# Altium PCB Phaser.PcbDoc (part 2 of 16)
Units mm, origin at the board's own origin, x right, y up, seen from the top; angles counter-clockwise.
Board outline 161.99 x 100 mm, 6 copper layers (TopLayer, MidLayer1, MidLayer2, SignalLayer1, Internal Plane 1, BottomLayer), stack 1.528 mm thick; 1017 components, 665 nets, 3453 pads, 2223 vias.
Unrouted connection lines stored in the file: 1.
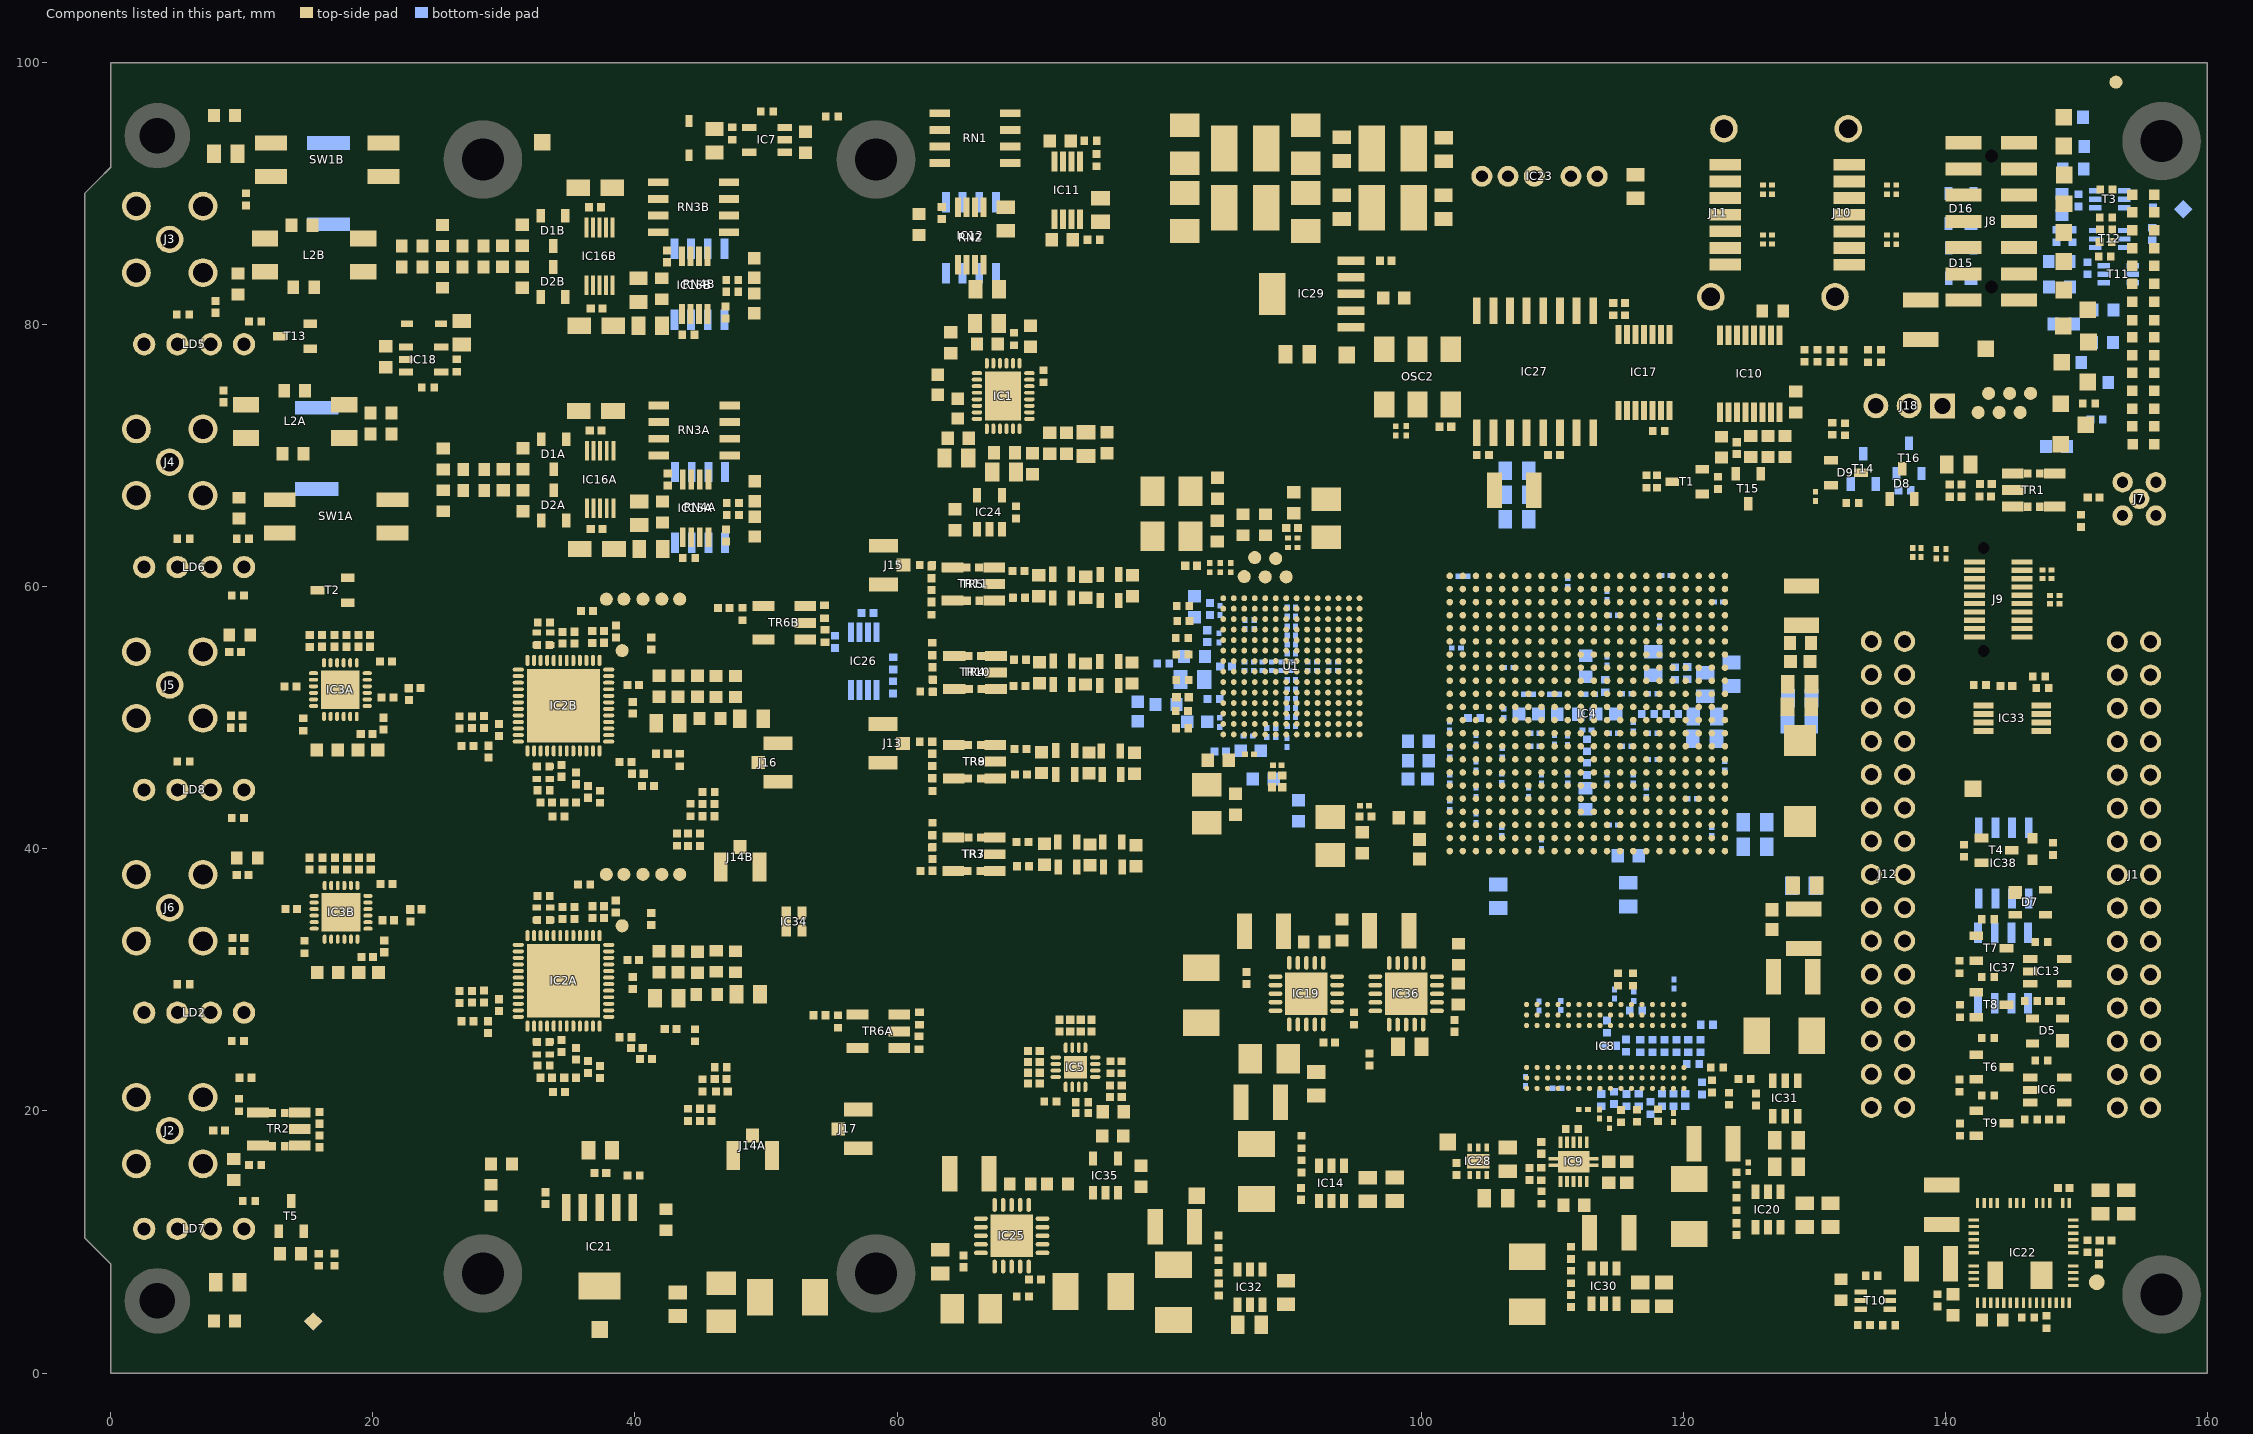
[diagram p6: the components of this part, seen from the top]

## Components (designator, comment, footprint, x,y, rotation, side; value= is the part's Value field where it differs from the comment) (continued)
C236 "100nF" CAPC0603X33N 98.056,71.895 r270 top
C237 "100nF" CAPC0603X33N 98.856,71.9 r270 top
C238 "10nF" CAPC1005X55N 101.835,72.207 r0 top
C239A "100nF" CAPC1005X55N 46.95,63.905 r270 top (schematic designator C239)
C239B "100nF" CAPC1005X55N 46.9,80.93 r270 top (schematic designator C239)
C240 "22uF" CAPC1709X100N 115.79,39.466 r180 bottom
C241A "100nF" CAPC1005X55N 42.5,68.18 r90 top (schematic designator C241)
C241B "100nF" CAPC1005X55N 42.45,85.205 r90 top (schematic designator C241)
C242 "100nF" CAPC1005X55N 148.35,28.4 r0 top
C243 "Undefined" CAPC2012X135N 8.775,93.025 r0 top
C244 "Undefined" CAPC2012X135N 8.919,6.94 r0 top
C245 "1uF" CAPC1608X87N 53.025,93.925 r270 top
C246A "1.5nF" CAPC1608X87N 44.769,31.332 r90 top (schematic designator C246)
C246B "1.5nF" CAPC1608X87N 44.764,52.39 r90 top (schematic designator C246)
C247 "22uF" CAPC2012X135N 101.7,88.967 r270 top
C248 "22uF" CAPC2012X135N 93.925,88.967 r90 top
C249 "22uF" CAPC2012X135N 116.35,90.542 r270 top
C250 "22uF" CAPC2012X135N 101.725,93.367 r270 top
C251 "22uF" CAPMP3528X210N 91.2,88.592 r90 top
C252 "1uF" CAPC1608X87N 20.984,77.533 r270 top
C253 "10uF" CAPC2012X135N 153.8,13.05 r90 top
C254 "100nF" CAPC1005X55N 125.55,20.875 r90 top
C255 "22uF" CAPMP3528X210N 91.2,93.767 r90 top
C256 "1uF" CAPC1005X55N 70.525,7.125 r180 top
C257 "47uF" CAPC3225X270N 65.525,15.2 r0 top
C258 "10uF" CAPC2012X135N 127.875,17.75 r0 top
C259 "10uF" CAPC2012X135N 127.875,15.75 r0 top
C260 "47uF" CAPC3225X270N 128.375,30.243 r180 top
C261 "100nF" CAPC1005X55N 90.825,13.675 r90 top
C262 "10uF" CAPC2012X135N 97.975,14.025 r270 top
C263 "10uF" CAPC2012X135N 95.925,14 r270 top
C264 "47uF" CAPC3225X270N 87.75,20.663 r180 top
C265 "1uF" CAPC1005X55N 86.654,30.147 r90 top
C266 "100nF" CAPC1005X55N 37.36,15.275 r180 top
C267 "10nF" CAPC1005X55N 33.169,13.341 r270 top
C268 "10uF" CAPC2012X135N 141.005,69.328 r180 top
C269 "47uF" CAPC3225X270N 88.004,33.722 r0 top
C270A "1uF" CAPC1005X55N 23.19,52.26 r0 top (schematic designator C270)
C270B "1uF" CAPC1005X55N 23.276,35.39 r0 top (schematic designator C270)
C271 "22uF" CAPC1709X100N 84.443,64.25 r270 top
C272A "1uF" CAPC1005X55N 13.725,52.4 r0 top (schematic designator C272)
C272B "1uF" CAPC1005X55N 13.775,35.404 r0 top (schematic designator C272)
C273A "1uF" CAPC1005X55N 17.996,55.865 r270 top (schematic designator C273)
C273B "1uF" CAPC1005X55N 18.046,38.868 r270 top (schematic designator C273)
C274A "1uF" CAPC1005X55N 17.071,55.865 r270 top (schematic designator C274)
C274B "1uF" CAPC1005X55N 17.121,38.868 r270 top (schematic designator C274)
C275A "1uF" CAPC1005X55N 16.121,55.865 r270 top (schematic designator C275)
C275B "1uF" CAPC1005X55N 16.171,38.868 r270 top (schematic designator C275)
C276A "1uF" CAPC1005X55N 15.191,55.857 r270 top (schematic designator C276)
C276B "1uF" CAPC1005X55N 15.178,38.868 r270 top (schematic designator C276)
C277A "10uF" CAPC1608X80N 19.625,47.55 r180 top (schematic designator C277)
C277B "10uF" CAPC1608X80N 19.675,30.554 r180 top (schematic designator C277)
C278 "100nF" CAPC1005X55N 110.125,70.05 r0 top
C279 "100nF" CAPC1005X55N 124.07,70.575 r90 top
C280A "0.5pF" CAPC1005X50N 61.687,25.199 r270 top (schematic designator C280)
C280B "0.5pF" CAPC1005X50N 54.507,56.241 r270 top (schematic designator C280)
C281A "0.5pF" CAPC1005X50N 61.712,27.049 r270 top (schematic designator C281)
C281B "0.5pF" CAPC1005X50N 54.462,58.091 r270 top (schematic designator C281)
C282A "120pF" CAPC1608X87N 41.839,31.39 r90 top (schematic designator C282)
C282B "120pF" CAPC1608X87N 41.839,52.39 r90 top (schematic designator C282)
C283A "1.5nF" CAPC1608X87N 43.289,31.39 r90 top (schematic designator C283)
C283B "1.5nF" CAPC1608X87N 43.289,52.39 r90 top (schematic designator C283)
C284A "33pF" CAPC2012X135N 48.649,28.898 r180 top (schematic designator C284)
C284B "33pF" CAPC2012X135N 48.894,49.932 r180 top (schematic designator C284)
C285A "33pF" CAPC2012X135N 42.427,28.596 r0 top (schematic designator C285)
C285B "33pF" CAPC2012X135N 42.525,49.593 r0 top (schematic designator C285)
C286A "4.7pF" CAPC1005X55N 39.277,25.619 r180 top (schematic designator C286)
C286B "4.7pF" CAPC1005X55N 39.277,46.619 r180 top (schematic designator C286)
C287A "1uF" CAPC1005X55N 40.146,24.809 r180 top (schematic designator C287)
C287B "1uF" CAPC1005X55N 40.226,45.729 r180 top (schematic designator C287)
C288A "100pF" CAPC1005X55N 27.555,28.714 r90 top (schematic designator C288)
C288B "100pF" CAPC1005X55N 27.555,49.661 r90 top (schematic designator C288)
C289A "100pF" CAPC1005X55N 28.798,26.395 r90 top (schematic designator C289)
C289B "100pF" CAPC1005X55N 28.819,47.416 r90 top (schematic designator C289)
C290 "1nF" CAPC1005X55N 82.443,61.6 r0 top
C291 "220nF" CAPC0603X33N 90.197,62.983 r0 top
C292 "220nF" CAPC0603X33N 88.246,53.6 r180 bottom
C293 "220nF" CAPC0603X33N 89.77,56.625 r90 bottom
C294 "220nF" CAPC0603X33N 89.77,51.1 r270 bottom
C295 "220nF" CAPC0603X33N 89.671,53.6 r180 bottom
C296 "220nF" CAPC0603X33N 89.671,54.26 r180 bottom
C297 "220nF" CAPC0603X33N 90.197,63.708 r0 top
C298 "220nF" CAPC0603X33N 88.246,54.26 r180 bottom
C299 "220nF" CAPC0603X33N 89.764,48.108 r90 bottom
C300 "220nF" CAPC0603X33N 88.9,48.87 r90 bottom
C301 "22uF" CAPMP3528X210N 92.747,65.216 r90 top
C302 "22uF" CAPC1709X100N 90.272,66.391 r270 top
C303 "1nF" CAPC1005X55N 90.147,64.491 r0 top
C304 "220nF" CAPC0603X33N 84.621,49.65 r270 bottom
C305 "22uF" CAPMP3528X210N 83.644,43.45 r270 top
C306 "22uF" CAPC1709X100N 84.518,46.75 r0 top
C307 "1nF" CAPC1005X55N 83.671,56.225 r270 bottom
C308 "220nF" CAPC0603X33N 86.793,48.6 r180 bottom
C309 "100nF" CAPC1608X90N 86.993,47.5 r180 bottom
C310 "220nF" CAPC0603X33N 93.293,54.26 r180 bottom
C311 "220nF" CAPC0603X33N 90.4,52.525 r270 bottom
C312 "220nF" CAPC0603X33N 90.4,56.625 r90 bottom
C313 "220nF" CAPC0603X33N 95.67,43.28 r180 top
C314 "220nF" CAPC0603X33N 89.77,55.25 r90 bottom
C315 "220nF" CAPC0603X33N 89.77,52.525 r270 bottom
C316 "220nF" CAPC0603X33N 93.293,53.6 r180 bottom
C317 "220nF" CAPC0603X33N 90.4,51.1 r270 bottom
C318 "220nF" CAPC0603X33N 90.4,55.25 r90 bottom
C319 "22uF" CAPMP3528X210N 93.07,40.98 r270 top
C320 "22uF" CAPC1709X100N 95.495,40.455 r90 top
C321 "1nF" CAPC1005X55N 95.745,42.455 r180 top
C322 "2.2uF" CAPC1005X55N 83.871,58.3 r270 bottom
C323 "220nF" CAPC0603X33N 84.646,58.2 r270 bottom
C324 "220nF" CAPC0603X33N 91.693,53.6 r0 bottom
C325 "220nF" CAPC0603X33N 90.4,58.075 r270 bottom
C326 "220nF" CAPC0603X33N 90.4,49.7 r90 bottom
C327 "220nF" CAPC0603X33N 91.693,54.26 r0 bottom
C328 "220nF" CAPC0603X33N 89.77,49.7 r90 bottom
C329 "220nF" CAPC0603X33N 89.77,58.075 r270 bottom
C330 "100nF" CAPC1005X55N 152.225,10.125 r180 top
C331 "15pF" CAPC1005X55N 151.725,8.75 r90 top
C332 "100nF" CAPC1005X55N 102.678,15.57 r270 top
C333 "100nF" CAPC1005X55N 124.05,10.975 r90 top
C334 "10uF" CAPC2012X135N 131.225,12.05 r270 top
C335 "10uF" CAPC2012X135N 129.25,12.05 r270 top
C336 "47uF" CAPC3225X270N 122.3,17.5 r180 top
C337 "10uF" CAPC2012X135N 105.703,13.328 r180 top
C338 "10uF" CAPC2012X135N 106.603,16.301 r90 top
C339 "1uF" CAPC1608X87N 78.619,15.022 r270 top
C340 "1uF" CAPC1608X87N 76.468,18.088 r180 top
C341 "100nF" CAPC1005X55N 111.425,5.5 r90 top
C342 "10uF" CAPC2012X135N 118.525,6 r270 top
C343 "10uF" CAPC2012X135N 116.7,6 r270 top
C344 "47uF" CAPC3225X270N 114.35,10.7 r180 top
C345 "100nF" CAPC1005X55N 84.55,6.375 r90 top
C346 "10uF" CAPC2012X135N 89.675,6.15 r270 top
C347 "10uF" CAPC2012X135N 86.9,3.675 r0 top
C348 "47uF" CAPC3225X270N 81.205,11.176 r180 top
C349 "22uF" CAPC2012X135N 92,22.075 r90 top
C350 "22uF" CAPMP3528X210N 88.404,23.972 r180 top
C351 "22uF" CAPC2012X135N 63.295,8.502 r270 top
C352 "22uF" CAPMP3528X210N 65.666,4.895 r180 top
C353 "100nF" CAPC1005X55N 144.65,52.425 r0 top
C354A "100pF" CAPC1005X55N 46.63,21.485 r180 top (schematic designator C354)
C354B "100pF" CAPC1005X55N 45.616,42.485 r180 top (schematic designator C354)
C355A "100pF" CAPC1005X55N 45.404,20.169 r180 top (schematic designator C355)
C355B "100pF" CAPC1005X55N 44.504,41.169 r180 top (schematic designator C355)
C356A "100pF" CAPC1005X55N 35.06,22.533 r180 top (schematic designator C356)
C356B "100pF" CAPC1005X55N 35.06,43.533 r180 top (schematic designator C356)
C357A "4.7pF" CAPC1005X55N 34.39,24.953 r90 top (schematic designator C357)
C357B "4.7pF" CAPC1005X55N 34.39,45.953 r90 top (schematic designator C357)
C358A "1uF" CAPC1005X55N 33.233,22.528 r0 top (schematic designator C358)
C358B "1uF" CAPC1005X55N 33.232,43.527 r0 top (schematic designator C358)
C359 "100nF" CAPC1005X55N 140.775,67.795 r0 top
C360 "100nF" CAPC1005X55N 89.398,45.145 r90 top
C361 "1uF" CAPC1608X87N 97.908,82.023 r0 top
C362 "100nF" CAPC1005X55N 140.775,66.867 r0 top
C363 "100nF" CAPC1005X55N 88.598,45.145 r90 top
C364 "22uF" CAPMP3528X210N 81.95,93.767 r90 top
C365 "22uF" CAPMP3528X210N 81.95,88.592 r90 top
C366 "10uF" CAPC2012X135N 26.784,79.383 r90 top
C367 "1uF" CAPC1005X55N 92.979,25.222 r180 top
C368 "100nF" CAPC0603X33N 130.089,66.893 r270 top
C369A "10nF" CAPC1005X55N 22.764,51.8 r90 top (schematic designator C369)
C369B "10nF" CAPC1005X55N 22.866,34.904 r90 top (schematic designator C369)
C370A "10nF" CAPC1005X55N 13.725,52.4 r180 top (schematic designator C370)
C370B "10nF" CAPC1005X55N 13.775,35.404 r180 top (schematic designator C370)
C371A "10nF" CAPC1005X55N 21,54.3 r180 top (schematic designator C371)
C371B "10nF" CAPC1005X55N 21.05,37.304 r180 top (schematic designator C371)
C372A "10nF" CAPC1005X55N 19.796,55.865 r270 top (schematic designator C372)
C372B "10nF" CAPC1005X55N 19.846,38.868 r270 top (schematic designator C372)
C373A "10nF" CAPC1005X55N 18.896,55.865 r270 top (schematic designator C373)
C373B "10nF" CAPC1005X55N 18.946,38.868 r270 top (schematic designator C373)
C374A "10nF" CAPC1005X55N 17.996,55.865 r270 top (schematic designator C374)
C374B "10nF" CAPC1005X55N 18.046,38.868 r270 top (schematic designator C374)
C375A "10nF" CAPC1005X55N 17.071,55.865 r270 top (schematic designator C375)
C375B "10nF" CAPC1005X55N 17.121,38.868 r270 top (schematic designator C375)
C376A "10nF" CAPC1005X55N 16.121,55.865 r270 top (schematic designator C376)
C376B "10nF" CAPC1005X55N 16.171,38.868 r270 top (schematic designator C376)
C377A "10nF" CAPC1005X55N 15.164,55.862 r270 top (schematic designator C377)
C377B "10nF" CAPC1005X55N 15.178,38.868 r270 top (schematic designator C377)
C378 "20pF" CAPC1608X87N 74.739,39.53 r270 top
C379 "12pF" CAPC1608X87N 77.963,60.062 r90 top
C380 "20pF" CAPC1608X87N 74.4,59.972 r90 top
C381 "12pF" CAPC1608X87N 70.814,60.062 r90 top
C382 "1uF" CAPC1005X55N 62.696,38.777 r90 top
C383 "1uF" CAPC1005X55N 62.696,40.584 r270 top
C384 "1uF" CAPC1005X55N 62.686,47.722 r270 top
C385 "1uF" CAPC1005X55N 62.686,45.86 r90 top
C386 "1uF" CAPC1005X55N 62.737,52.419 r90 top
C387 "1uF" CAPC1005X55N 62.712,54.313 r270 top
C388 "1uF" CAPC1005X55N 62.633,61.089 r270 top
C389 "1uF" CAPC1005X55N 62.633,59.304 r90 top
C1009 "2.2uF" CAPC1005X55N 84.663,47.421 r0 bottom
D1A "BAV199" SOT95P240X110-3N 33.8,70.105 r270 top (schematic designator D1)
D1B "BAV199" SOT95P240X110-3N 33.75,87.155 r270 top (schematic designator D1)
D2A "BAV199" SOT95P240X110-3N 33.8,66.205 r90 top (schematic designator D2)
D2B "BAV199" SOT95P240X110-3N 33.75,83.255 r90 top (schematic designator D2)
D3 "1PS76SB10" SOD2512X110N 23.909,80.058 r0 top
D5 "PRTR5V0U2X" SOT190P230X110-4N 147.789,26.103 r180 top
D6 "1PS76SB10" SOD2512X110N 44.125,94.225 r90 top
D7 "PRTR5V0U2X" SOT190P230X110-4N 146.475,35.923 r0 top
D8 "BAV199" SOT95P240X110-3N 136.685,67.843 r90 top
D9 "BAV199" SOT95P240X110-3N 132.407,68.704 r0 top
D15 "PRTR5V0U2X" SOT190P230X110-4N 141.199,84.684 r90 bottom
D16 "PRTR5V0U2X" SOT190P230X110-4N 141.193,88.854 r90 bottom
FTG1 "Use only in PCB" FIDUCIAL_TOP_C100-200 153.01,98.501 r90 top
FTG2 "Use only in PCB" FIDUCIAL_TOP_S100-200 15.465,3.938 r90 top
FTG3 "Use only in PCB" FIDUCIAL_TOP_S100-200 158.147,88.799 r90 bottom
FTG4 "Use only in PCB" FIDUCIAL_TOP_S100-200 15.465,3.938 r90 bottom
HS1 "RADIAN_FI23" RADIAN_FI23 112.701,50.325 r90 top
HS2 "Heat Sink No Pad" HSINK_HSB03-121218 90.093,53.925 r0 top
HS3A "Heat Sink No Pad" HSINK_17156 34.55,50.925 r90 top (schematic designator HS3)
HS3B "Heat Sink No Pad" HSINK_17156 34.55,29.925 r90 top (schematic designator HS3)
IC1 "LTC2323CUFD-16#PBF" QFN50P400X500X80-29N-R275X375 68.1,74.55 r0 top
IC2A "TRF372017IRGZ" QFN50P700X700X100-49N-S560 34.55,29.925 r270 top (schematic designator IC2)
IC2B "TRF372017IRGZ" QFN50P700X700X100-49N-S560 34.55,50.925 r270 top (schematic designator IC2)
IC3A "HMC542BLP4E" QFN50P400X400X100-25N-S295 17.525,52.15 r180 top (schematic designator IC3)
IC3B "HMC542BLP4E" QFN50P400X400X100-25N-S295 17.575,35.154 r180 top (schematic designator IC3)
IC4 "XC7A100T-3FGG484E" FGG484 112.675,50.325 r90 top locked
IC5 "Si53340-B-GM" QFN50P300X300X90-17N-S175 73.618,23.335 r90 top
IC6 "24AA02E48T-I/OT" SOT95P280X145-5N 147.775,21.6 r0 top
IC7 "LT1761ES5-SD#TRMPBF" SOT95P280X100-5N 50.075,94.1 r180 top
IC8 "MT41K256M16TW-107:P" BGA96C80P9X16_800X1400X120 114.041,24.92 r90 top locked
IC9 "TPS51200DRCT" "TEXAS_DRC (S-PVSON-N10)" 111.628,16.112 r90 top
IC10 "SC18IS602B" SOP65P640X110-16N 125.07,76.25 r270 top
IC11 "LTC6655BHMS8-4.096#PBF" SOP65P490X110-8N 72.995,90.25 r270 top
IC12 "OPA2197IDGKR" SOP65P490X110-8N 65.635,86.762 r90 top
IC13 "24AA02E48T-I/OT" SOT95P280X145-5N 147.775,30.65 r0 top
IC14 "TPS563201DDC" SOT95P280X110-6N 93.15,14.475 r90 top
IC15A "OPA2197IDGKR" SOP65P490X110-8N 44.625,65.98 r270 top (schematic designator IC15)
IC15B "OPA2197IDGKR" SOP65P490X110-8N 44.575,83.005 r270 top (schematic designator IC15)
IC16A "AD8253ARMZ" SOP50P490X110-10N 37.35,68.18 r90 top (schematic designator IC16)
IC16B "AD8253ARMZ" SOP50P490X110-10N 37.3,85.205 r90 top (schematic designator IC16)
IC17 "74HC4066PW" SOP65P640X110-14N 117,76.35 r90 top
IC18 "LT1964ES5-SD#TRMPBF" SOT95P280X100-5N 23.884,77.333 r0 top
IC19 "TPS74901RGWT" QFN65P500X500X100-21N-S325 91.229,28.947 r0 top
IC20 "TPS563201DDC" SOT95P280X110-6N 126.45,12.475 r90 top
IC21 "TPS79650DCQ" SOT127P700X180-6N 37.3,9.639 r270 top
IC22 "MIC45116-1YMP" MICROCHIP_H3QFN88-52LD-PL-3 145.95,9.175 r270 top
IC23 "TRN 1-1222" DCDC_TRACO_TRN1 109.025,91.167 r180 top
IC24 "SN65LVDS2DBVR" SOT95P280X145-5N 67.05,65.675 r90 top
IC25 "TPS74901RGWT" QFN65P500X500X100-21N-S325 68.75,10.475 r0 top
IC26 "LM75AIMM/NOPB" SOP65P490X109-8N 57.448,54.319 r90 bottom
IC27 "S25FL128SAGMFIR01" SOIC127P1030X265-16N 108.675,76.4 r270 top
IC28 "TPS72012DRV" SON65P200X200X80-7N-R110X170 104.353,16.162 r270 top
IC29 "TPS79625DCQG4" SOT127P700X180-6N 91.627,82.339 r180 top
IC30 "TPS563201DDC" SOT95P280X110-6N 113.95,6.625 r90 top
IC31 "TPS563201DDC" SOT95P280X110-6N 127.775,20.95 r90 top
IC32 "TPS563201DDC" SOT95P280X110-6N 86.925,6.55 r90 top
IC33 "LM75AIMM/NOPB" SOP65P490X109-8N 145.1,49.965 r180 top
IC34 "PAT1220-C-10DB-T10" SUSUMU_PAT1220 52.15,34.441 r270 top
IC35 "ADP151AUJZ-1.8-R7" SOT95P280X90-5N 75.904,15.063 r90 top
IC36 "TPS74901RGWT" QFN65P500X500X100-21N-S325 98.85,28.939 r0 top
IC37 "24AA025E48-I/SN" SOIC127P600X175-8N 144.4,30.906 r270 bottom
IC38 "24AA025E48-I/SN" SOIC127P600X175-8N 144.45,38.909 r270 bottom
J1 "" 3M_N2530-6002RB 154.384,38.018 r270 top locked
J2 "SMA" AMPHENOL_132203-14 4.5,18.5 r180 top locked
J3 "SMA" AMPHENOL_132203-14 4.5,86.5 r180 top locked
J4 "SMA" AMPHENOL_132203-14 4.5,69.5 r180 top locked
J5 "SMA" AMPHENOL_132203-14 4.5,52.5 r180 top locked
J6 "SMA" AMPHENOL_132203-14 4.5,35.5 r180 top locked
J7 "MMCX" SAMTEC_MMCX-J-P-H-ST-TH1 154.788,66.7 r90 top
J8 "Milli-Grid™" MOLEX_87832-1420 143.5,87.875 r90 top
J9 "" SAMTEC_LSS-110-01-L-DV-A 144.025,59.028 r90 top
J10 "SATA" MOLEX_67800-5005 132.675,88.385 r90 top
J11 "SATA" MOLEX_67800-5005 123.2,88.39 r90 top
J12 "" 3M_N2530-6002RB 135.614,38.044 r270 top locked
J13 "U.FL" HIROSE_U.FL-R-SMT-1(10) 58.928,48.045 r90 top
J14A "U.FL" HIROSE_U.FL-R-SMT-1(10) 48.983,16.595 r180 top (schematic designator J14)
J14B "U.FL" HIROSE_U.FL-R-SMT-1(10) 48.029,38.607 r180 top (schematic designator J14)
J15 "U.FL" HIROSE_U.FL-R-SMT-1(10) 58.975,61.646 r90 top
J16 "U.FL" HIROSE_U.FL-R-SMT-1(10) 50.928,46.585 r270 top
J17 "U.FL" HIROSE_U.FL-R-SMT-1(10) 57.047,18.625 r270 top
J18 "KK®" MOLEX_22-27-2031 137.228,73.8 r180 top
L1 "56nH" IND_MURATA_LQW18AS_0Z 76.301,47.476 r180 top
L2A "2x6.5mH" IND_WURTH_WE-SL2 14.076,72.625 r0 top (schematic designator L2)
L2B "2x6.5mH" IND_WURTH_WE-SL2 15.525,85.305 r0 top (schematic designator L2)
L3 "10uH" IND_MURATA-PS_8400 97.825,88.917 r180 top
L4 "120R@100MHz" INDC1608X65N 108.2,50.275 r0 bottom
L5 "120R@100MHz" INDC1608X65N 114.09,50.297 r180 bottom
L6 "56nH" IND_MURATA_LQW18AS_0Z 76.47,38.625 r180 top
L7 "220R@100MHz" INDC1608X95N 82.7,58.465 r90 bottom
L8 "390R@100MHz" INDC1608X95N 76.025,71 r270 top
L9 "10uH" IND_MURATA-PS_8400 86.575,88.917 r180 top
L10 "120R@100MHz" INDC1608X95N 76.493,19.935 r0 top
L11 "220R@100MHz" INDC1608X95N 85.817,43.406 r270 top
L12 "56nH" IND_MURATA_LQW18AS_0Z 76.429,40.507 r180 top
L13 "120R@100MHz" INDC1608X65N 128.918,54.286 r0 top
L14 "220R@100MHz" INDC1608X95N 87.941,45.325 r0 bottom
L15 "120R@100MHz" INDC1608X65N 99.739,45.325 r0 bottom
L16A "220R@100MHz" INDC1608X95N 16.525,47.55 r0 top (schematic designator L16)
L16B "220R@100MHz" INDC1608X95N 16.575,30.554 r0 top (schematic designator L16)
L17 "220R@100MHz" INDC1608X95N 84.443,67.525 r90 top
L18 "120R@100MHz" INDC1608X65N 99.867,39.963 r90 top
L19A "1k@100MHz" INDC1005X55N 41.245,34.656 r90 top (schematic designator L19)
L19B "1k@100MHz" INDC1005X55N 41.245,55.656 r90 top (schematic designator L19)
L20A "1k@100MHz" INDC1005X55N 37.346,22.974 r270 top (schematic designator L20)
L20B "1k@100MHz" INDC1005X55N 37.346,43.974 r270 top (schematic designator L20)
L21 "56nH" IND_MURATA_LQW18AS_0Z 72.839,47.512 r180 top
L22A "1k@100MHz" INDC1005X55N 40.843,23.952 r0 top (schematic designator L22)
L22B "1k@100MHz" INDC1005X55N 40.998,44.797 r0 top (schematic designator L22)
L23 "56nH" IND_MURATA_LQW18AS_0Z 76.369,45.675 r180 top
L24A "1k@100MHz" INDC1005X55N 38.536,35.591 r90 top (schematic designator L24)
L24B "1k@100MHz" INDC1005X55N 38.546,56.591 r90 top (schematic designator L24)
L25A "1k@100MHz" INDC1005X55N 34.2,21.436 r0 top (schematic designator L25)
L25B "1k@100MHz" INDC1005X55N 34.159,42.477 r0 top (schematic designator L25)
L26 "120R@100MHz" INDC1608X65N 126.775,34.6 r90 top
L27A "1k@100MHz" INDC1005X55N 36.129,37.279 r180 top (schematic designator L27)
L27B "1k@100MHz" INDC1005X55N 36.35,58.137 r180 top (schematic designator L27)
L28 "56nH" IND_MURATA_LQW18AS_0Z 73.003,38.607 r180 top
L29A "10nH" IND_COILCRAFT_0402DC 33.5,24.8 r270 top (schematic designator L29)
L29B "10nH" IND_COILCRAFT_0402DC 33.506,45.812 r270 top (schematic designator L29)
L30 "56nH" IND_MURATA_LQW18AS_0Z 72.994,40.51 r180 top
L31A "10nH" IND_COILCRAFT_0402DC 32.5,24.8 r270 top (schematic designator L31)
L31B "10nH" IND_COILCRAFT_0402DC 32.5,45.812 r270 top (schematic designator L31)
L32 "56nH" IND_MURATA_LQW18AS_0Z 72.839,45.675 r180 top
L33A "10nH" IND_COILCRAFT_0402DC 33.55,35.044 r90 top (schematic designator L33)
L33B "10nH" IND_COILCRAFT_0402DC 33.55,56.035 r90 top (schematic designator L33)
L34A "1k@100MHz" INDC1005X55N 26.607,28.704 r90 top (schematic designator L34)
L34B "1k@100MHz" INDC1005X55N 26.607,49.651 r90 top (schematic designator L34)
L35A "1k@100MHz" INDC1005X55N 27.217,26.845 r180 top (schematic designator L35)
L35B "1k@100MHz" INDC1005X55N 27.217,47.845 r180 top (schematic designator L35)
L36 "56nH" IND_MURATA_LQW18AS_0Z 76.193,52.47 r180 top
L37 "56nH" IND_MURATA_LQW18AS_0Z 72.627,52.54 r180 top
L38A "10nH" IND_COILCRAFT_0402DC 32.5,35.044 r90 top (schematic designator L38)
L38B "10nH" IND_COILCRAFT_0402DC 32.5,56.035 r90 top (schematic designator L38)
L39 "56nH" IND_MURATA_LQW18AS_0Z 76.193,54.294 r180 top
L40 "56nH" IND_MURATA_LQW18AS_0Z 72.627,54.318 r180 top
L41 "220R@100MHz" INDC1608X95N 90.645,42.905 r270 bottom
L42 "2.2uH" IND_BOURNS_SRP5015TA 127.704,25.737 r180 top
L43 "2.2uH" IND_BOURNS_SRP5015TA 87.425,15.375 r90 top
L44 "10uH" IND_MURATA-PS_8400 97.825,93.442 r180 top
L45 "10uH" IND_MURATA-PS_8400 86.575,93.442 r180 top
L46 "2.2uH" IND_BOURNS_SRP5015TA 83.204,28.822 r90 top
L47 "2.2uH" IND_BOURNS_SRP5015TA 108.1,6.775 r90 top
L48 "2.2uH" IND_BOURNS_SRP5015TA 81.1,6.156 r90 top
L49 "2.2uH" IND_BOURNS_SRP5015TA 51.65,5.79 r180 top
L50 "2.2uH" IND_BOURNS_SRP5015TA 120.45,12.7 r90 top
L51 "2.2uH" IND_BOURNS_SRP5015TA 74.963,6.225 r180 top
L52A "1k@100MHz" INDC1005X55N 46.551,23.335 r0 top (schematic designator L52)
L52B "1k@100MHz" INDC1005X55N 45.626,44.335 r0 top (schematic designator L52)
L53 "56nH" IND_MURATA_LQW18AS_0Z 76.21,60.942 r180 top
L54 "56nH" IND_MURATA_LQW18AS_0Z 72.593,60.95 r180 top
L55 "56nH" IND_MURATA_LQW18AS_0Z 76.21,58.938 r180 top
L56 "56nH" IND_MURATA_LQW18AS_0Z 72.593,59.126 r180 top
LD1 "Green" LED_KINGBRIGHT_KPH-1608CGCKr 155.092,88.556 r0 top
LD2 "Red/Green" LED_DIALIGHT_571-0112F 2.55,27.5 r0 top locked
LD3 "Green" LED_KINGBRIGHT_KPH-1608CGCK 146.642,40 r90 top
LD4 "Green" LED_KINGBRIGHT_KPH-1608CGCKr 155.092,80.34 r0 top
LD5 "Red/Green" LED_DIALIGHT_571-0112F 2.55,78.5 r0 top locked
LD6 "Red/Green" LED_DIALIGHT_571-0112F 2.55,61.5 r0 top locked
LD7 "Red/Green" LED_DIALIGHT_571-0112F 2.55,11 r0 top locked
LD8 "Red/Green" LED_DIALIGHT_571-0112F 2.55,44.5 r0 top locked
LD9 "Green" LED_KINGBRIGHT_KPH-1608CGCKr 155.092,87.196 r0 top
LD10 "Green" LED_KINGBRIGHT_KPH-1608CGCKr 155.092,89.916 r0 top
LD11 "Green" LED_KINGBRIGHT_KPH-1608CGCKr 155.092,73.593 r0 top
LD12 "Green" LED_KINGBRIGHT_KPH-1608CGCKr 155.092,85.835 r0 top
LD13 "Green" LED_KINGBRIGHT_KPH-1608CGCKr 155.092,84.475 r0 top
LD14 "Green" LED_KINGBRIGHT_KPH-1608CGCKr 155.092,83.115 r0 top
LD15 "Green" LED_KINGBRIGHT_KPH-1608CGCKr 155.092,81.755 r0 top
LD16 "Green" LED_KINGBRIGHT_KPH-1608CGCKr 155.092,79.019 r0 top
LD17 "Green" LED_KINGBRIGHT_KPH-1608CGCKr 155.092,77.674 r0 top
LD18 "Green" LED_KINGBRIGHT_KPH-1608CGCKr 155.092,76.314 r0 top
LD19 "Green" LED_KINGBRIGHT_KPH-1608CGCKr 155.092,74.953 r0 top
LD20 "Green" LED_KINGBRIGHT_KPH-1608CGCKr 155.092,72.233 r0 top
LD21 "Green" LED_KINGBRIGHT_KPH-1608CGCKr 155.116,70.873 r0 top
OSC2 "125MHz" OSC_SILICON-LAB_SI510-6N 99.721,76.005 r270 top
R1 "0" RESC1005X40N#1 68.925,78.9 r90 top
R2 "0" RESC1005X40N#1 65.922,40.857 r0 top
R3 "0" RESC1005X40N#1 62.696,38.774 r270 top
R4 "0" RESC1005X40N#1 74.77,94.025 r180 top
R5 "100" RESC1005X40N#1 71.168,76.057 r270 top
R6 "0" RESC1005X40N#1 75,86.475 r0 top
R7 "24k" RESC1608X55N 61.678,87.637 r90 top
R8A "Undefined" RESC1608X55N 14.036,74.95 r0 top (schematic designator R8)
R8B "Undefined" RESC1608X55N 14.6,87.58 r0 top (schematic designator R8)
R9A "0" RESC1608X55N 20.63,73.253 r0 top (schematic designator R9)
R9B "0" RESC1608X55N 23,86.005 r0 top (schematic designator R9)
R10A "1k8" RESC1608X55N 27.7,68.955 r0 top (schematic designator R10)
R10B "1k8" RESC1608X55N 27.65,86.005 r0 top (schematic designator R10)
R11 "49R9" RESC1005X40N#1 81.753,49.2 r180 top
R12 "49R9" RESC1005X40N#1 81.733,50.52 r180 top
R13 "49R9" RESC1005X40N#1 81.785,52.872 r180 top
R14 "0" RESC1608X55N 9.39,15.522 r90 top
R15 "49R9" RESC1005X40N#1 81.737,51.562 r180 top
R16 "49R9" RESC1005X40N#1 81.77,54.818 r180 top
R17 "0" RESC1005X40N#1 62.67,40.552 r90 top
R18 "13k" RESC1005X40N#1 139.4,5.55 r90 top
R19 "2k2" RESC1608X55N 143.578,4.05 r180 top
R20 "43k" RESC1005X40N#1 47.425,94.575 r270 top
R21 "49R9" RESC1005X40N#1 81.742,56.079 r180 top
R22 "100" RESC1005X40N#1 74.118,19.835 r0 top
R23 "5k1" RESC1005X40N#1 50.075,96.275 r180 top
R24 "49R9" RESC1005X40N#1 81.813,58.522 r180 top
R25A "0" RESC1608X55N 20.63,71.653 r0 top (schematic designator R25)
R25B "0" RESC1608X55N 23,84.405 r0 top (schematic designator R25)
R26 "1k" RESC1005X40N#1 9.7,25.338 r0 top
R27 "0" RESC1005X40N#1 150.343,65.024 r90 top
R28 "1k" RESC1005X40N#1 11.025,80.241 r0 top
R29 "10k" RESC1005X40N#1 10.326,89.56 r90 top
R30 "1k" RESC1005X40N#1 9.7,59.338 r0 top
R31 "49R9" RESC1005X40N#1 81.843,57.391 r180 top
R32 "0" RESC1005X40N#1 65.912,47.918 r0 top
R33 "10k" RESC1005X40N#1 152.273,90.322 r180 top
R34 "1k27" RESC1608X55N 82.692,54.676 r180 bottom
R35 "10" RESC1005X40N#1 80.315,54.153 r180 bottom
R36 "1k" RESC1608X55N 88.12,64.727 r90 top
R37 "60R4" RESC1005X40N#2 69.621,38.673 r180 top
R38A "91" RESC1005X40N#1 33.038,23.474 r0 top (schematic designator R38)
R38B "91" RESC1005X40N#1 33.038,44.466 r0 top (schematic designator R38)
R39 "60R4" RESC1005X40N#2 69.575,40.526 r180 top
R40 "60R4" RESC1005X40N#2 69.43,47.625 r180 top
R41A "91" RESC1005X40N#1 33.038,36.404 r0 top (schematic designator R41)
R41B "91" RESC1005X40N#1 33.046,57.255 r0 top (schematic designator R41)
R42 "1k" RESC1005X40N#1 117.175,68.025 r90 top
R43 "1k" RESC1005X40N#1 117.984,68.02 r270 top
R44 "1k" RESC1005X40N#1 10.55,13.125 r180 top
R45 "0" RESC1005X40N#1 146.737,66.105 r180 top
R46 "0" RESC1005X40N#1 12.8,17.3 r0 top
R47 "49R9" RESC1005X40N#1 76.293,23.335 r270 top
R48 "0" RESC1005X40N#1 117.3,50.275 r0 bottom
R49A "100" RESC1005X40N#1 32.995,25.273 r180 top (schematic designator R49)
R49B "100" RESC1005X40N#1 32.995,46.279 r180 top (schematic designator R49)
R50 "0" RESC1005X40N#1 65.912,45.378 r0 top
R51A "100k" RESC1608X55N 25.375,69.755 r270 top (schematic designator R51)
R51B "100k" RESC1608X55N 25.325,86.805 r270 top (schematic designator R51)
R52 "49R9" RESC1005X40N#1 74.118,20.66 r180 top
R53 "43k" RESC1005X40N#1 26.409,76.883 r90 top
R54 "60R4" RESC1005X40N#2 69.472,45.659 r180 top
R55 "100" RESC1005X40N#1 69.075,65.675 r270 top
R56 "0" RESC1608X55N 125.145,70.7 r90 top
R57 "300" RESC1005X40N#1 141.425,39.85 r270 top
R58A "47" RESC1005X40N#1 47.475,65.48 r0 top (schematic designator R58)
R58B "47" RESC1005X40N#1 47.425,82.505 r0 top (schematic designator R58)
R59 "0" RESC1005X40N#1 65.871,38.317 r0 top
R60 "0" RESC1005X40N#1 55.042,95.885 r0 top
R61 "60R4" RESC1005X40N#2 69.358,52.418 r180 top
R62 "0" RESC1005X40N#1 65.963,52.185 r0 top
R63 "0" RESC1005X40N#1 84.157,51.446 r0 bottom
R64 "1k" RESC1005X40N#1 5.512,80.772 r180 top
R65 "100" RESC0603X28N 89.003,46.37 r180 top
R66 "0" RESC1005X40N#1 65.938,54.725 r0 top
R67 "60R4" RESC1005X40N#2 69.388,54.455 r180 top
R68 "0" RESC1005X40N#1 62.712,52.464 r270 top
R69 "0" RESC1005X40N#1 62.712,54.293 r90 top
R70 "100k" RESC1005X40N#1 143.25,25.575 r0 top
R71A "100" RESC1005X40N#1 33.02,34.569 r0 top (schematic designator R71)
R71B "100" RESC1005X40N#1 33.007,55.55 r0 top (schematic designator R71)
R72A "24k" RESC1608X55N 42.1,65.705 r90 top (schematic designator R72)
R72B "24k" RESC1608X55N 42.05,82.73 r90 top (schematic designator R72)
R73 "0" RESC1005X40N#1 146.737,68.645 r180 top
R74A "1k8" RESC1608X55N 27.7,67.355 r0 top (schematic designator R74)
R74B "1k8" RESC1608X55N 27.65,84.405 r0 top (schematic designator R74)
R75 "100k" RESC1005X40N#1 9.741,32.2 r180 top
R76 "60R4" RESC1005X40N#2 69.274,61.185 r180 top
R77 "0" RESC1005X40N#1 65.783,61.468 r0 top
R78 "10k" RESC1005X40N#1 141.1,18.57 r270 top
R80 "5k1" RESC1005X40N#1 24.209,75.208 r0 top
R81 "0" RESC1005X40N#1 9.775,20.45 r270 top
R82 "100k" RESC1005X40N#1 143.25,34.625 r0 top
R83A "49R9" RESC6331X70N 15.725,70.555 r90 bottom (schematic designator R83)
R83B "49R9" RESC6331X70N 16.612,90.753 r270 bottom (schematic designator R83)
R84 "10k" RESC1005X40N#1 141.1,27.62 r270 top
R85 "0" RESC1005X40N#1 65.808,58.928 r0 top
R86 "60R4" RESC1005X40N#2 69.307,59.158 r180 top
R87 "1k5" RESC1608X55N 29.017,13.566 r270 top
R88 "100" RESC0603X28N 86.893,47.225 r0 top
R89 "0" RESC1005X40N#1 120.3,53.4 r270 bottom
R90 "0" RESC1005X40N#1 75.22,92.55 r270 top
R91 "0" RESC1005X40N#1 119.15,50.275 r180 bottom
R92 "1k" RESC1005X40N#1 148.2,40 r270 top
R93 "1k" RESC1005X40N#1 119.35,53.375 r90 bottom
R94 "2k2" RESC1005X40N#1 114.65,81.175 r270 top
R95 "2k2" RESC1005X40N#1 115.55,81.175 r270 top
R96 "2k2" RESC1005X40N#1 104.7,70.05 r0 top
R97A "47" RESC1005X40N#1 47.475,66.38 r0 top (schematic designator R97)
R97B "47" RESC1005X40N#1 47.425,83.405 r0 top (schematic designator R97)
R98A "Undefined" RESC1608X55N 13.904,70.15 r0 top (schematic designator R98)
R98B "Undefined" RESC1608X55N 14.725,82.85 r0 top (schematic designator R98)
R99 "51" RESC1005X40N#1 116.6,20.828 r270 bottom
R100 "51" RESC1005X40N#1 116.378,27.657 r180 bottom
R101 "51" RESC1005X40N#1 116.471,19.634 r270 top
R102 "51" RESC1005X40N#1 115.65,20.825 r270 bottom
R103 "51" RESC1005X40N#1 114.7,21 r270 bottom
R104 "51" RESC1005X40N#1 113.735,20.825 r270 bottom
R105 "51" RESC1005X40N#1 121.315,24.953 r270 bottom
R106 "51" RESC1005X40N#1 122.57,23.323 r0 top
R107 "51" RESC1005X40N#1 116.715,24.953 r270 bottom
R108 "51" RESC1005X40N#1 120.37,24.953 r270 bottom
R109 "51" RESC1005X40N#1 115.636,24.977 r270 bottom
R110 "51" RESC1005X40N#1 120.74,23.578 r0 bottom
R111 "51" RESC1005X40N#1 121.79,26.578 r0 bottom
R112 "51" RESC1005X40N#1 120.14,20.828 r270 bottom
R113 "51" RESC1005X40N#1 119.47,24.953 r270 bottom
R114 "51" RESC1005X40N#1 118.071,19.672 r270 top
R115 "51" RESC1005X40N#1 117.64,24.953 r270 bottom
R116 "51" RESC1005X40N#1 117.5,20.219 r270 bottom
R117 "51" RESC1005X40N#1 119.24,20.828 r270 bottom
R118 "51" RESC1005X40N#1 118.565,24.953 r270 bottom
R119 "51" RESC1005X40N#1 118.366,20.828 r270 bottom
R120 "51" RESC1005X40N#1 114.17,26.433 r90 bottom
R121 "51" RESC1005X40N#1 114.415,24.978 r0 bottom
R122 "51" RESC1005X40N#1 115.015,30.028 r270 top
R123 "5k1" RESC1005X40N#1 122.195,21.879 r90 top
R124 "240" RESC1005X40N#1 121.42,21.724 r270 bottom
R125 "240" RESC1005X40N#1 116.153,30.028 r270 top
R126 "51" RESC1005X40N#1 115.24,19.603 r90 top
R127 "10k" RESC1005X40N#1 111.503,18.612 r0 top
R128 "10k" RESC1005X40N#1 109.178,13.387 r90 top
R129 "10k" RESC1005X40N#1 109.153,15.187 r270 top
R130 "1k5" RESC1608X55N 29.817,15.96 r0 top
R131 "4k7" RESC1005X40N#1 123.486,20.928 r90 top
R132 "10k" RESC1005X40N#1 39.904,15.063 r0 top
R133 "10k" RESC1005X40N#1 90.875,17.625 r90 top
R134 "20k" RESC1005X40N#1 146.3,4.225 r0 top
R135 "10k" RESC1005X40N#1 90.875,15.775 r270 top
R136 "1k6" RESC1005X40N#1 150.85,9.675 r90 top
R137A "100k" RESC1608X55N 25.375,66.555 r90 top (schematic designator R137)
R137B "100k" RESC1608X55N 25.325,83.605 r90 top (schematic designator R137)
R138A "2k4" RESC1005X40N#1 44.125,62.205 r180 top (schematic designator R138)
R138B "2k4" RESC1005X40N#1 44.075,79.23 r180 top (schematic designator R138)
R139 "10k" RESC1005X40N#1 135.7,3.65 r180 top
R140 "100k" RESC1005X40N#1 143.25,21.175 r0 top
R141 "10k" RESC1005X40N#1 141.075,21.925 r90 top
R142 "10k" RESC1005X40N#1 146.525,19.35 r180 top
R143 "1k2" RESC1608X55N 13.725,9.1 r0 top
R144 "10k" RESC1005X40N#1 147.325,23.85 r180 top
R145 "100k" RESC1005X40N#1 143.25,30.225 r0 top
R146 "10k" RESC1005X40N#1 141.075,30.975 r90 top
R147 "470" RESC1005X40N#1 14.785,32.515 r90 top
R148 "10k" RESC1005X40N#1 146.525,28.4 r180 top
R149 "10k" RESC1005X40N#1 147.325,32.9 r180 top
R150 "100k" RESC1005X40N#1 11.02,15.865 r180 top
R151 "100k" RESC1005X40N#1 9.615,49.236 r180 top
R152 "1k" RESC1005X40N#1 5.56,46.662 r180 top
R153 "1k" RESC1005X40N#1 5.56,29.662 r180 top
R154 "10k" RESC1005X40N#1 133.775,3.675 r0 top
R155 "2k2" RESC1608X55N 132.025,6.35 r90 top
R156 "0" RESC1608X55N 9.7,83.1 r90 top
R157 "0" RESC1608X55N 9.791,65.994 r90 top
R158 "0" RESC1608X55N 9.84,56.306 r180 top
R159 "0" RESC1608X55N 8.69,95.956 r180 top
R160 "0" RESC1608X55N 10.412,39.314 r180 top
R161 "0" RESC1608X55N 8.69,3.968 r180 top
R162 "10k" RESC1005X40N#1 59.715,54.153 r90 bottom
R163 "100" RESC1005X40N#1 77.118,23.335 r90 top
R164 "10k" RESC1005X40N#1 134.375,7.425 r0 top
R165 "470" RESC1005X40N#1 71.698,20.71 r0 top
R166 "15k" RESC1005X40N#1 124.05,14.845 r90 top
R167 "4k7" RESC1608X55N 69.4,14.425 r180 top
R168 "1k5" RESC1608X55N 72.25,14.425 r180 top
R169 "10k" RESC1005X40N#1 15.875,8.645 r270 top
R170 "470" RESC1005X40N#1 14.691,49.485 r90 top
R171 "10k" RESC1005X40N#1 59.698,52.319 r90 bottom
R172 "10k" RESC1005X40N#1 147.7,3.9 r270 top
R173 "0" RESC1005X40N#1 94.877,27.049 r90 top
R174 "0" RESC1005X40N#1 17.075,8.65 r270 top
R175 "0" RESC1005X40N#1 147.404,52.261 r180 top
R176 "0" RESC1005X40N#1 142.625,52.5 r180 top
R177 "10k" RESC1005X40N#1 155.845,89.405 r270 bottom
R178 "0" RESC1005X40N#1 55.253,55.794 r270 bottom
R179 "0" RESC1005X40N#1 147.142,53.162 r180 top
R180 "10k" RESC1608X55N 91.829,32.897 r180 top
R181 "20k" RESC1608X55N 93.961,33.8 r270 top
R182 "3k3" RESC1608X55N 149.695,95.822 r180 bottom
R183 "3k3" RESC1608X55N 149.796,93.599 r180 bottom
R184 "100" RESC1005X40N#1 81.749,49.188 r180 top
R185 "0" RESC1608X55N 126.825,81.05 r0 top
R186 "0" RESC1608X55N 126.445,70.7 r270 top
R187 "0" RESC1608X55N 122.92,70.65 r90 top
R188 "0" RESC1608X55N 127.745,70.7 r270 top
R189 "0" RESC1608X55N 128.579,74.1 r90 top
R190 "10k" RESC1005X40N#1 122.645,67.925 r90 top
R191 "100" RESC1005X40N#1 104.035,49.977 r0 bottom
R192 "10k" RESC1005X40N#1 118.125,71.875 r0 top
R193A "49R9" RESC1005X40N#1 55.487,26.824 r90 top (schematic designator R193)
R193B "49R9" RESC1005X40N#1 48.2,57.925 r90 top (schematic designator R193)
R194A "330" RESC1608X55N 45.474,28.898 r180 top (schematic designator R194)
R194B "330" RESC1608X55N 45.719,49.932 r180 top (schematic designator R194)
R195A "330" RESC1608X55N 47.674,31.384 r90 top (schematic designator R195)
R195B "330" RESC1608X55N 47.674,52.384 r90 top (schematic designator R195)
R196A "330" RESC1608X55N 46.207,31.427 r270 top (schematic designator R196)
R196B "330" RESC1608X55N 46.199,52.382 r270 top (schematic designator R196)
R197 "11k" RESC1005X40N#1 124.05,12.895 r270 top
R198 "43k" RESC1005X40N#1 111.425,9.175 r90 top
R199 "13k" RESC1005X40N#1 111.425,7.325 r270 top
R200 "56k" RESC1005X40N#1 84.525,8.125 r270 top
R201 "15k" RESC1005X40N#1 84.525,10.025 r90 top
R202 "10k" RESC1005X40N#1 152.248,88.163 r180 top
R203 "10k" RESC1005X40N#1 150.165,89.484 r90 bottom
R204 "10k" RESC1005X40N#1 152.26,87.249 r180 top
R205 "3k3" RESC1608X55N 149.746,91.872 r180 bottom
R206 "10k" RESC1005X40N#1 155.778,86.918 r270 bottom
R207 "10k" RESC1005X40N#1 152.222,86.309 r180 top
R208 "3k3" RESC1608X55N 148.895,89.167 r90 bottom
R209 "10k" RESC1005X40N#1 149.708,86.766 r90 bottom
R210 "10k" RESC1005X40N#1 148.463,86.754 r90 bottom
R211 "1k" RESC1608X55N 148.679,84.811 r180 bottom
R212 "1k2" RESC1608X55N 148.704,82.88 r180 bottom
R213 "1k2" RESC1608X55N 152.019,81.102 r180 bottom
R214 "1k2" RESC1608X55N 149.022,80.035 r180 bottom
R215 "1k2" RESC1608X55N 151.994,78.638 r180 bottom
R216 "3k3" RESC1608X55N 149.568,77.114 r180 bottom
R217 "3k3" RESC1608X55N 151.625,75.59 r180 bottom
R218 "10k" RESC1005X40N#1 150.952,73.99 r180 top
R219 "10k" RESC1005X40N#1 151.536,72.746 r180 bottom
R220 "10k" RESC1608X55N 148.476,70.688 r180 bottom
R221 "10k" RESC1005X40N#1 152.156,85.195 r180 top
R222 "10k" RESC1005X40N#1 150.825,84.303 r270 bottom
R223 "15k" RESC1005X40N#1 69.6,5.85 r180 top
R224A "75" RESC1005X40N#1 45.166,21.955 r90 top (schematic designator R224)
R224B "75" RESC1005X40N#1 44.241,42.955 r90 top (schematic designator R224)
R225A "75" RESC1005X40N#1 44.054,19.699 r270 top (schematic designator R225)
R225B "75" RESC1005X40N#1 43.204,40.699 r270 top (schematic designator R225)
R226A "49R9" RESC1005X40N#1 44.575,25.775 r270 top (schematic designator R226)
R226B "49R9" RESC1005X40N#1 43.422,46.783 r270 top (schematic designator R226)
R227 "0" RESC1005X40N#1 62.686,47.689 r90 top
R228 "0" RESC1005X40N#1 62.686,45.86 r270 top
R229 "0" RESC1005X40N#1 62.633,61.138 r90 top
R230 "0" RESC1005X40N#1 62.633,59.284 r270 top
R231 "10k" RESC1608X55N 86.395,64.727 r90 top
R232 "1k" RESC1608X55N 80.518,51.003 r180 bottom
R233 "1k" RESC1005X40N#1 114.038,52.425 r90 bottom
R234 "1k" RESC1005X40N#1 9.7,42.338 r0 top
R235 "470" RESC1005X40N#1 130.241,77.621 r90 top
R236 "470" RESC1005X40N#1 135.087,77.6 r90 top
R238 "0" RESC1005X40N#1 112.65,47.9 r270 bottom
R239 "0" RESC1005X40N#1 112.65,46.1 r90 bottom
R240 "1k" RESC1608X55N 42.36,11.697 r270 top
R241 "15k" RESC1005X40N#1 124.675,22.425 r0 top
R242 "470" RESC1005X40N#1 131.231,77.617 r90 top
R243 "470" RESC1005X40N#1 132.231,77.621 r90 top
R244 "470" RESC1005X40N#1 134.092,77.6 r270 top
R245 "0" RESC1005X40N#1 12.8,19.845 r0 top
R246 "0" RESC1005X40N#1 62.204,48.172 r0 top
R247 "0" RESC1005X40N#1 62.214,61.646 r0 top
R248 "0" RESC1005X40N#1 69.621,38.673 r0 top
R249 "0" RESC1005X40N#1 62.264,38.317 r0 top
R250 "0" RESC1005X40N#1 62.696,41.504 r270 top
R251 "0" RESC1005X40N#1 62.712,44.882 r90 top
R252 "0" RESC1005X40N#1 62.242,51.994 r0 top
R253 "0" RESC1005X40N#1 62.686,55.258 r270 top
R254 "0" RESC1005X40N#1 62.633,58.318 r90 top
R255 "10k" RESC1608X55N 102.85,31.958 r90 top
R256 "20k" RESC1608X55N 102.825,28.932 r90 top
R257 "0" RESC1005X40N#1 52.756,34.417 r90 top
R258 "100" RESC1005X40N#1 81.733,50.52 r180 top
R259 "10k" RESC1005X40N#1 10.085,63.662 r0 top
R260 "1k" RESC1005X40N#1 5.56,63.662 r180 top
R261 "470" RESC1005X40N#1 129.246,77.621 r90 top
R262 "10k" RESC1005X40N#1 132.907,66.392 r0 top
R263 "100" RESC1005X40N#1 81.785,52.872 r180 top
R264 "100" RESC1005X40N#1 81.839,51.562 r180 top
R265 "100" RESC1005X40N#1 81.77,54.818 r180 top
R266 "100" RESC1005X40N#1 81.742,56.079 r180 top
R267 "100" RESC1005X40N#1 81.813,58.522 r180 top
R268 "100" RESC1005X40N#1 81.843,57.391 r180 top
R269 "0" RESC1005X40N#1 69.575,40.526 r0 top
R270 "0" RESC1005X40N#1 69.43,47.625 r0 top
R271 "0" RESC1005X40N#1 69.472,45.659 r0 top
R272 "0" RESC1005X40N#1 69.358,52.418 r0 top
R273 "0" RESC1005X40N#1 69.383,54.426 r0 top
R274 "0" RESC1005X40N#1 69.274,61.185 r0 top
R275 "0" RESC1005X40N#1 69.307,59.158 r0 top
R276 "10k" RESC1005X40N#1 132.341,72.013 r90 top
R277 "10k" RESC1005X40N#1 131.359,72.054 r90 top
R278 "10k" RESC1005X40N#1 136.889,67.362 r180 bottom
RN1 "10k 5K 5K 10K" SOIC127P600X175-8N 65.95,94.225 r180 top
RN2 "10k 5K 5K 10K" SOIC127P600X175-8N 65.635,86.63 r270 bottom
RN3A "10k 5K 5K 10K" SOIC127P600X175-8N 44.525,71.93 r0 top (schematic designator RN3)
RN3B "10k 5K 5K 10K" SOIC127P600X175-8N 44.475,88.955 r0 top (schematic designator RN3)
RN4A "10k 5K 5K 10K" SOIC127P600X175-8N 44.975,66.055 r90 bottom (schematic designator RN4)
RN4B "10k 5K 5K 10K" SOIC127P600X175-8N 44.925,83.08 r90 bottom (schematic designator RN4)
SW1A "Switch" SW_CTS_204-121ST 17.198,65.36 r0 top (schematic designator SW1)
SW1B "Switch" SW_CTS_204-121ST 16.525,92.579 r0 top (schematic designator SW1)
T1 "BSS138LT1G" SOT95P240X110-3N 120.295,68.025 r180 top
T2 "BSS138LT1G" SOT95P240X110-3N 16.929,59.743 r180 top
T3 "BC847BS" SOT65P210X110-6N 152.527,89.56 r180 bottom
T4 "BSS138LT1G" SOT95P240X110-3N 143.9,39.875 r0 top
T5 "BSS138LT1G" SOT95P240X110-3N 13.775,11.975 r90 top
T6 "BSS138LT1G" SOT95P240X110-3N 143.5,23.35 r0 top
T7 "BSS138LT1G" SOT95P240X110-3N 143.5,32.4 r0 top
T8 "BSS138LT1G" SOT95P240X110-3N 143.5,28.1 r0 top
T9 "BSS138LT1G" SOT95P240X110-3N 143.5,19.05 r0 top
T10 "BC847BS" SOT65P210X110-6N 134.65,5.525 r0 top
T11 "BC847BS" SOT65P210X110-6N 153.187,83.845 r180 bottom
T12 "BC847BS" SOT65P210X110-6N 152.535,86.538 r180 bottom
T13 "BSS138LT1G" SOT95P240X110-3N 14.075,79.102 r180 top
T14 "BSS138LT1G" SOT95P240X110-3N 133.738,68.993 r90 bottom
T15 "BSS138LT1G" SOT95P240X110-3N 124.945,67.475 r270 top
T16 "BSS84AK" SOT95P230X110-3N 137.228,69.793 r90 bottom
TP1 "Test Point" TPS127 149.073,91.415 r90 top
TP2 "TP" TP 151.55,6.925 r90 top
TP3 "Test Point" TPS127 149.047,89.224 r90 top
TP4 "Test Point" TPS127 149.023,84.819 r0 top
TP5 "Test Point" TPS127 149.023,82.64 r0 top
TP6 "Test Point" TPS127 150.858,81.136 r0 top
TP7 "Test Point" TPS127 149,79.891 r0 top
TP8 "Test Point" TPS127 150.852,75.615 r0 top
TP9 "Test Point" TPS127 150.704,72.346 r90 top
TP10 "Test Point" TPS127 149.023,87.027 r90 top
TP11 "Test Point" TPS127 148.795,70.873 r180 top
TP12 "Test Point" TPS127 32.927,93.904 r0 top
TP13 "Test Point" TPS127 149.023,95.822 r90 top
TP14 "Test Point" TPS127 149.023,93.625 r90 top
TP15 "Test Point" TPS127 150.915,78.668 r270 top
TP16 "Test Point" TPS127 148.87,77.13 r90 top
TP17 "Test Point" TPS127 102.026,17.627 r0 top
TP18 "Test Point" TPS127 148.795,73.951 r90 top
TP19 "Test Point" TPS127 37.302,3.323 r0 top
TP20 "Test Point" TPS127 94.325,77.679 r0 top
TP21 "Test Point" TPS127 143.077,78.156 r90 top
TP22 "Test Point" TPS127 142.1,44.577 r0 top
TP23 "Test Point" TPS127 82.881,13.538 r0 top
TR1 "1:2" XFMR_MINI-CIRCUITS_AT1521 146.738,67.38 r90 top
TR2 "1:2" XFMR_MINI-CIRCUITS_AT1521 12.825,18.622 r270 top
TR3 "1:4" XFMR_MINI-CIRCUITS_AT224 65.871,39.587 r270 top
TR4 "1:4" XFMR_MINI-CIRCUITS_AT224 65.938,53.455 r270 top
TR5 "1:4" XFMR_MINI-CIRCUITS_AT224 65.834,60.198 r270 top
TR6A "1:2" XFMR_MINI-CIRCUITS_AT1521 58.571,26.075 r270 top (schematic designator TR6)
TR6B "1:2" XFMR_MINI-CIRCUITS_AT1521 51.397,57.243 r270 top (schematic designator TR6)
TR7 "1:2" XFMR_MINI-CIRCUITS_AT1521 65.879,39.587 r270 top
TR8 "1:4" XFMR_MINI-CIRCUITS_AT224 65.912,46.648 r270 top
TR9 "1:2" XFMR_MINI-CIRCUITS_AT1521 65.912,46.648 r270 top
TR10 "1:2" XFMR_MINI-CIRCUITS_AT1521 65.973,53.455 r270 top
TR11 "1:2" XFMR_MINI-CIRCUITS_AT1521 65.82,60.214 r270 top
U1 "DAC34H84IZAY" TI-ZAY196 90.093,53.925 r180 top locked
WASHER1 "D11.1xd6.6" Keystone_7687 -4.607,86.5 r180 top
WASHER2 "D11.1xd6.6" Keystone_7687 -4.607,35.5 r180 top
WASHER3 "D11.1xd6.6" Keystone_7687 -4.607,69.5 r180 top
WASHER4 "D11.1xd6.6" Keystone_7687 -3.102,86.5 r0 top
WASHER5 "D11.1xd6.6" Keystone_7687 -4.85,18.5 r180 top
WASHER6 "D11.1xd6.6" Keystone_7687 -3.502,52.496 r0 top
WASHER7 "D11.1xd6.6" Keystone_7687 -3.324,69.489 r0 top
WASHER8 "D11.1xd6.6" Keystone_7687 -3.374,18.575 r0 top
WASHER9 "D11.1xd6.6" Keystone_7687 -3.102,35.5 r0 top
WASHER10 "D11.1xd6.6" Keystone_7687 -4.85,18.5 r180 top

## Footprints (in the part's own frame and the unit in brackets; to place one, negate y for a bottom-side part, rotate by r counter-clockwise, add the part's x,y. Pads: shape width x height; smd on the part's side, far side on the other; paste and mask are expansions set on the pad)
3M_N2530-6002RB [mm] "30 Contacts - Straight .100\" x .100\" Low Profile Four-Wall Header"
  round 1.6 hole 1: 1(-17.78,-1.27) 2(-17.78,1.27) 3(-15.24,-1.27) 4(-15.24,1.27) 5(-12.7,-1.27) 6(-12.7,1.27) 7(-10.16,-1.27) 8(-10.16,1.27) 9(-7.62,-1.27) 10(-7.62,1.27) 11(-5.08,-1.27) 12(-5.08,1.27) 13(-2.54,-1.27) 14(-2.54,1.27) 15(0,-1.27) 16(0,1.27) 17(2.54,-1.27) 18(2.54,1.27) 19(5.08,-1.27) 20(5.08,1.27) 21(7.62,-1.27) 22(7.62,1.27) 23(10.16,-1.27) 24(10.16,1.27) 25(12.7,-1.27) 26(12.7,1.27) 27(15.24,-1.27) 28(15.24,1.27) 29(17.78,-1.27) 30(17.78,1.27)
  silkscreen extent -22.71,-4.85 22.71,4.52, body extent -22.71,-4.11 22.71,4.52, height 9.91
AMPHENOL_132203-14 [mm] "50 Ohm Through Hole SMA Right Angle PCB Jack"
  round 2.1 hole 1.4: 1(0,0)
  round 2.2 hole 1.5: 2(-2.54,2.54) 2(-2.54,-2.54) 2(2.54,2.54) 2(2.54,-2.54)
  TopLayer region: -3.2,-4 -2.03,-4 -2.03,-2.03 -3.2,-2.03
  TopLayer region: 2.03,-4 4,-4 4,-2.03 2.03,-2.03
  TopLayer region: 2.03,2.03 4,2.03 4,4 2.03,4
  TopLayer region: -3.2,2.03 -2.03,2.03 -2.03,4 -3.2,4
  silkscreen extent -3.2,-5.1 19.1,5.1, body extent -4,-5.1 19.05,5.1, height 11.46
BGA96C80P9X16_800X1400X120 [mm] "BGA, 0.80mm Pitch, Rect.; 96 Pin, 9 Columns X 16 Rows, 8.00mm X 14.00mm X 1.20mm H"
  round 0.4 smd: A1(-3.2,6) A2(-2.4,6) A3(-1.6,6) A7(1.6,6) A8(2.4,6) A9(3.2,6) B1(-3.2,5.2) B2(-2.4,5.2) B3(-1.6,5.2) B7(1.6,5.2) B8(2.4,5.2) B9(3.2,5.2) C1(-3.2,4.4) C2(-2.4,4.4) C3(-1.6,4.4) C7(1.6,4.4) C8(2.4,4.4) C9(3.2,4.4) D1(-3.2,3.6) D2(-2.4,3.6) D3(-1.6,3.6) D7(1.6,3.6) D8(2.4,3.6) D9(3.2,3.6) E1(-3.2,2.8) E2(-2.4,2.8) E3(-1.6,2.8) E7(1.6,2.8) E8(2.4,2.8) E9(3.2,2.8) F1(-3.2,2) F2(-2.4,2) F3(-1.6,2) F7(1.6,2) F8(2.4,2) F9(3.2,2) G1(-3.2,1.2) G2(-2.4,1.2) G3(-1.6,1.2) G7(1.6,1.2) G8(2.4,1.2) G9(3.2,1.2) H1(-3.2,0.4) H2(-2.4,0.4) H3(-1.6,0.4) H7(1.6,0.4) H8(2.4,0.4) H9(3.2,0.4) J1(-3.2,-0.4) J2(-2.4,-0.4) J3(-1.6,-0.4) J7(1.6,-0.4) J8(2.4,-0.4) J9(3.2,-0.4) K1(-3.2,-1.2) K2(-2.4,-1.2) K3(-1.6,-1.2) K7(1.6,-1.2) K8(2.4,-1.2) K9(3.2,-1.2) L1(-3.2,-2) L2(-2.4,-2) L3(-1.6,-2) L7(1.6,-2) L8(2.4,-2) L9(3.2,-2) M1(-3.2,-2.8) M2(-2.4,-2.8) M3(-1.6,-2.8) M7(1.6,-2.8) M8(2.4,-2.8) M9(3.2,-2.8) N1(-3.2,-3.6) N2(-2.4,-3.6) N3(-1.6,-3.6) N7(1.6,-3.6) N8(2.4,-3.6) N9(3.2,-3.6) P1(-3.2,-4.4) P2(-2.4,-4.4) P3(-1.6,-4.4) P7(1.6,-4.4) P8(2.4,-4.4) P9(3.2,-4.4) R1(-3.2,-5.2) R2(-2.4,-5.2) R3(-1.6,-5.2) R7(1.6,-5.2) R8(2.4,-5.2) R9(3.2,-5.2) T1(-3.2,-6) T2(-2.4,-6) T3(-1.6,-6) T7(1.6,-6) T8(2.4,-6) T9(3.2,-6)
  silkscreen extent -4.72,-7 4,7, body extent -4.07,-7.07 4.08,7.08, height 1.2
C100 [mm] "1mm Diameter SMD Pad"
  round 1 smd paste-1: 1(0,0)
CAPC0603X33N [mm] "Chip Capacitor, Body 0.6x0.30mm, IPC Medium Density"
  rect 0.45x0.4 smd: 1(-0.35,0) 2(0.35,0)
  body extent -0.31,-0.16 0.32,0.17, height 0.33
CAPC1005X50N [mm] "Chip Capacitor, Body 1.0x0.55mm, IPC Medium Density"
  rect 0.57x0.68 smd: 1(-0.49,0) 2(0.49,0)
  body extent -0.5,-0.27 0.5,0.28, height 0.5
CAPC1005X55N [mm] "Capacitor, Non-Polarized, Chip; 1.00mm L X 0.50mm W X 0.70mm H, IPC Medium Density"
  rect 0.62x0.62 smd: 1(-0.45,0) 2(0.45,0)
  body extent -0.52,-0.27 0.53,0.28, height 0.55
CAPC1608X80N [mm] "Chip Capacitor, Body 1.6x0.8mm IPC Medium Density"
  rect 1x1 smd: 1(-0.75,0) 2(0.75,0)
  body extent -0.87,-0.47 0.88,0.48, height 0.8
CAPC1608X87N [mm] "Chip Capacitor, Body 1.6x0.8mm IPC Medium Density"
  rect 0.95x1 smd: 1(-0.8,0) 2(0.8,0)
  body extent -0.87,-0.47 0.88,0.48, height 0.87
CAPC1608X90N [mm] "Chip Capacitor, Body 1.6x0.8mm IPC Medium Density"
  rect 0.95x0.95 smd: 1(-0.75,0) 2(0.75,0)
  body extent -0.85,-0.45 0.85,0.45, height 0.9
CAPC1709X100N [mm] "Capacitor,non-Polarized, Chip;1.65mm L X 0.85mm W X 1.00mm H, IPC Medium Density"
  rect 0.95x1.05 smd: 1(-0.8,0) 2(0.8,0)
  body extent -0.9,-0.5 0.9,0.5, height 1
CAPC2012X95N [mm] "Chip Capacitor, Body 2.0x1.25mm, IPC Medium Density"
  rect 1.1x1.45 smd: 1(-0.9,0) 2(0.9,0)
  silkscreen extent 0,-0.58 0,0.58, body extent -1.05,-0.67 1.05,0.68, height 0.95
CAPC2012X135N [mm] "Chip Capacitor, Body 2.0x1.25mm, IPC Medium Density"
  rect 1.05x1.4 smd: 1(-0.9,0) 2(0.9,0)
  silkscreen extent 0,-0.58 0,0.58, body extent -1.05,-0.67 1.05,0.68, height 1.25
CAPC3225X270N [mm] "Chip Capacitor, Body 3.2x2.5mm, IPC Medium Density"
  rect 1.15x2.7 smd: 1(-1.5,0) 2(1.5,0)
  silkscreen extent -0.55,-1.25 0.55,1.25, body extent -1.7,-1.35 1.7,1.35, height 2.7
CAPMP3216X180N [mm] "Capacitor, Polarized, Molded  Body 3.2x1.6mm, IPC Medium Density"
  rect 1.8x1.25 smd: 1(-1.3,0) 2(1.3,0)
  silkscreen extent -2.4,-0.7 0,1.25, body extent -1.7,-0.9 1.7,0.9, height 1.6
CAPMP3528X210N [mm] "Capacitor, Polarized, Molded  Body 3.5x2.8mm, IPC Medium Density"
  rect 1.8x2.25 smd: 1(-1.45,0) 2(1.45,0)
  silkscreen extent -2.52,-1.5 1.85,1.72, body extent -1.85,-1.5 1.85,1.5, height 2.1
CAPMP7343X190N [mm] "Capacitor, Polarized, Molded  Body 7.3x4.3mm, IPC Medium Density"
  rect 2.35x2.45 smd: 1(-3.1,0) 2(3.1,0)
  silkscreen extent -4.92,-2.15 3.65,2.15, body extent -3.8,-2.3 3.8,2.3, height 1.9
DCDC_TRACO_TRN1 [mm] "TRN 1 Series , Body 11.9 x 7.7mm"
  round 1.6 hole 0.9: 1(-4.4,-0.15) 2(-2.4,-0.15) 3(0.4,-0.15) 4(2.4,-0.15) 5(4.4,-0.15)
  silkscreen extent -6.2,-5 6.2,4.1, body extent -6.2,-4.1 6.2,4.1, height 11.5